# Altium PCB BMS-v1.1.PcbDoc (part 2 of 2)
Units mil, origin at the board's own origin, x right, y up, seen from the top; angles counter-clockwise.
Board outline 1574.8 x 1574.8 mil, 2 copper layers (Top Layer, Bottom Layer), stack 34 mil thick; 76 components, 45 nets, 204 pads, 110 vias.
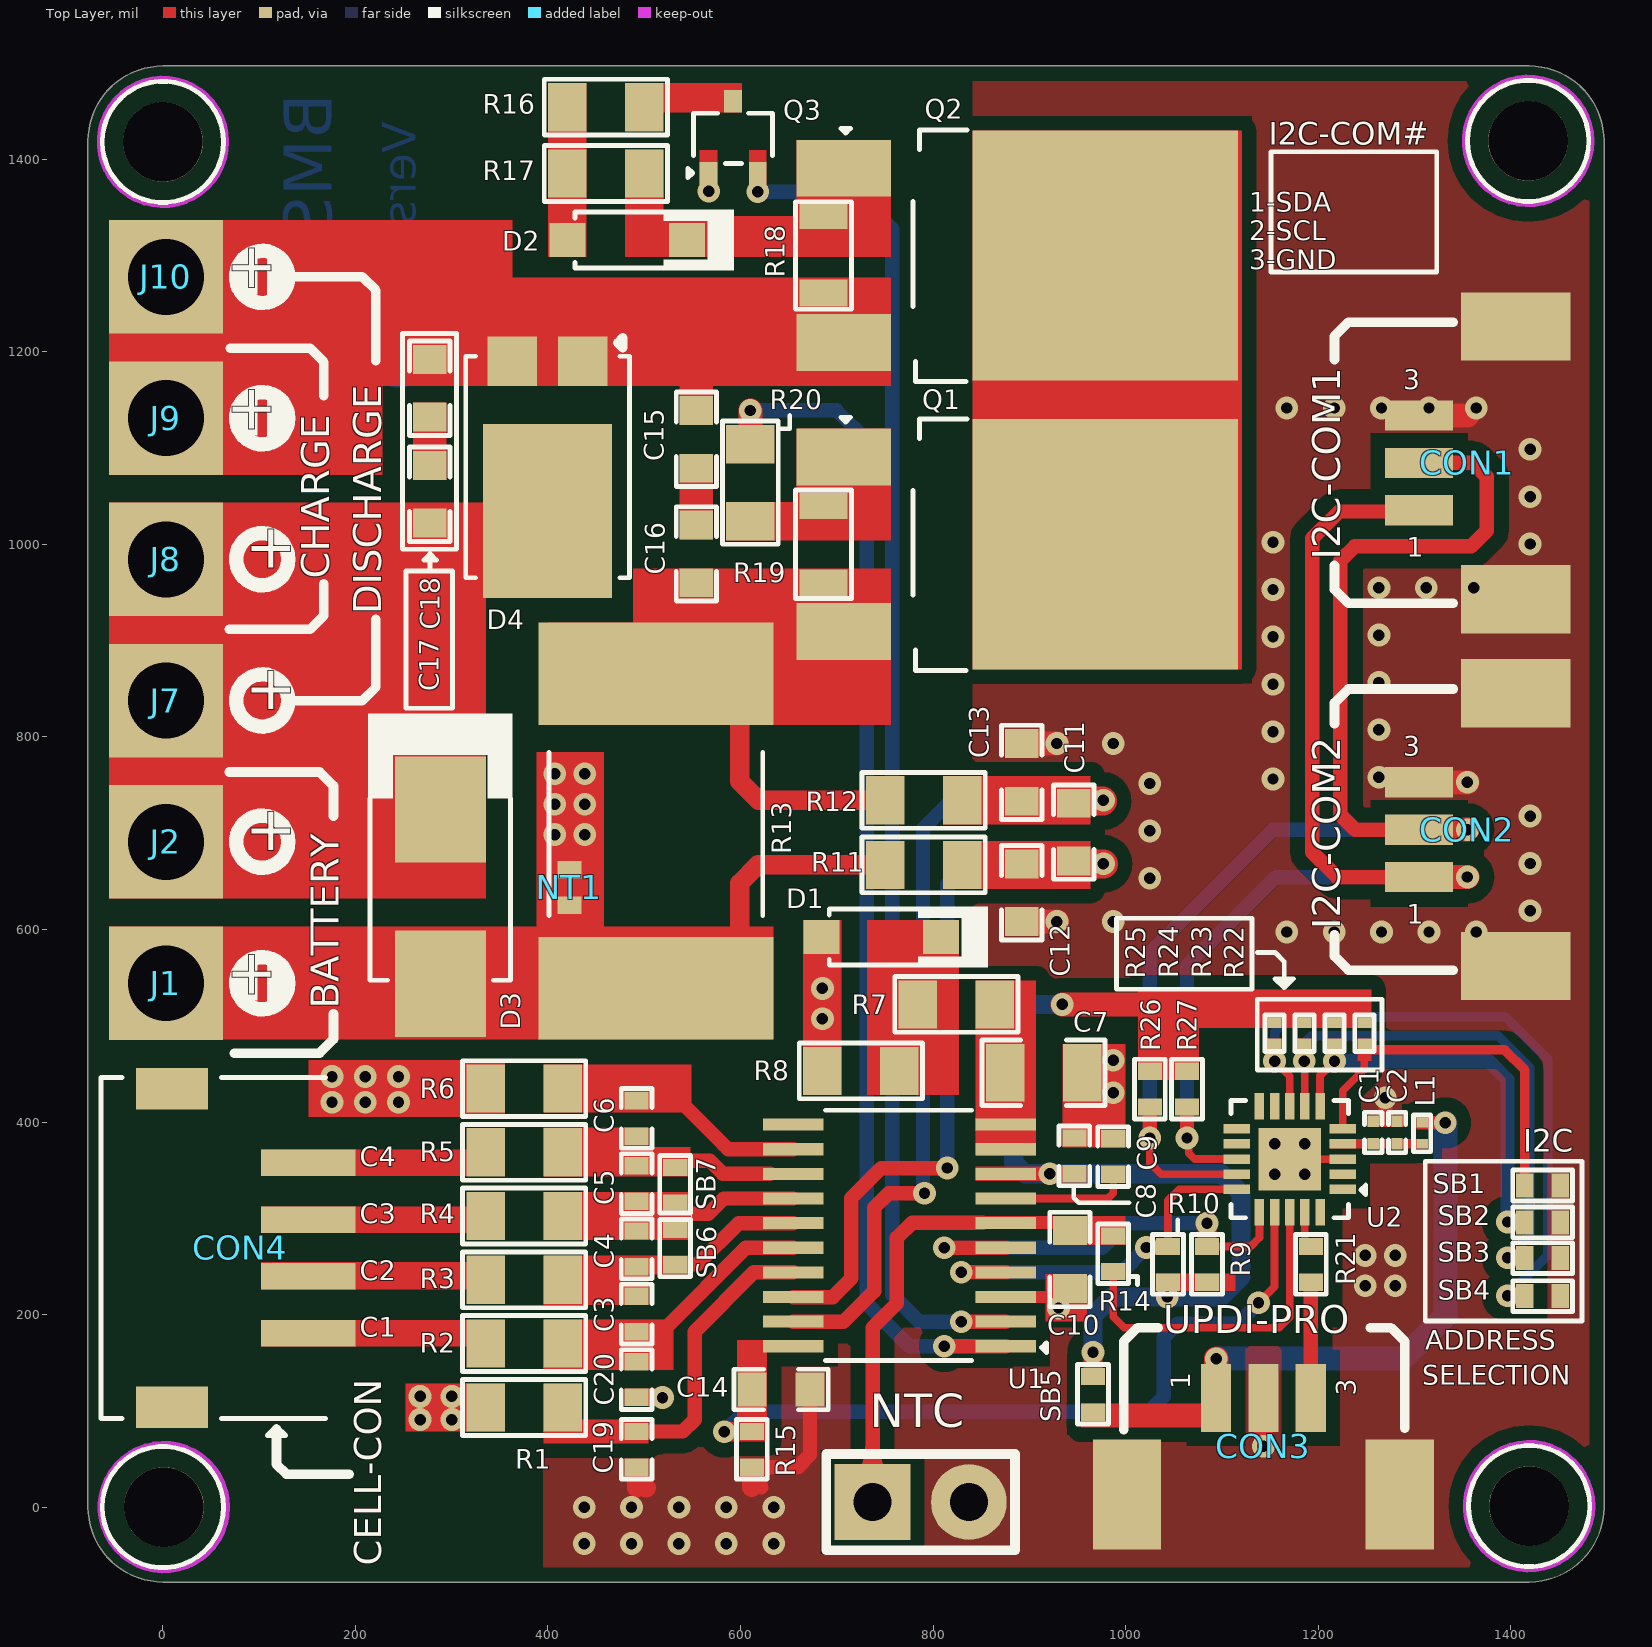
[diagram p0: Top Layer view]

## Via types
v1: diameter 23.62, hole 11.81, Top Layer to Bottom Layer, tented both sides, 110 vias

## Nets (pads, with @x,y where several pads share a name; then routed paths per layer and width w, separated by ;. In a path a pad name is that pad's centre, name@x,y a point inside that pad or via, vN(x,y) a via of type N, cw(c..) or ccw(c..) an arc to the next point about the centre after c; other vN are vias at no path point) (continued)
GND: (continued)
  other v1: 437.63,-37.89 486.84,-37.89 536.05,-37.89 585.26,-37.89 634.48,-37.89 437.63,-0.12 486.84,-0.12 536.05,-0.12 585.26,-0.12 634.48,-0.12 518.99,113.79 930.37,206.83 1248.95,229.91 1280.2,229.91 1248.95,261.49 1280.2,261.49 1154.79,345.7 1186.03,345.7 1154.79,377.28 1186.03,377.28 1269.85,425.13 987.2,430.43 987.2,464.27 1167.5,597.39 1216.72,597.39 1265.93,597.39 1315.14,597.39 1364.36,597.39 987.2,608.2 1420.2,619.41 1025.2,653.2 1420.2,668.62 407.08,698.57 438.33,698.57 1025.2,702.41 1420.2,717.84 407.08,730.15 438.33,730.15 1025.2,751.62 1153.11,756.34 1263.2,758.2 407.08,761.73 438.33,761.73 987.2,793.2 1153.11,805.55 1263.2,807.41 1153.11,854.77 1263.2,856.62 1153.11,903.98 1263.2,905.84 1153.11,953.19 1263.2,955.05 1312.41,955.05 1361.62,955.05 1420.2,1000.41 1153.11,1002.4 1420.2,1049.62 1420.2,1098.84 1167.5,1141.78 1216.72,1141.78 1265.93,1141.78 1315.14,1141.78 1364.36,1141.78 566.96,1366.9
NetC1_1: C1.1 C2.1 L1.2 U2.4
NetC15_2: C15.2 C16.1
NetC17_1: C17.1 C18.2
NetD1_2: D1.2 R7.1 R8.2
NetD2_1: D2.1 R16.1 R17.2
NetD2_2: D2.2 Q2.1 R17.1 R18.2
NetQ1_1: Q1.1 R19.2 R20.2
NetQ1_2: Q1.2 Q2.2
NetQ3_3: Q3.3 R16.2
NetR21_1: R21.1 U2.19 | length 38.3
  Top Layer w8: U2.19 1186.28,276.82 R21.1
PACK_N: C15.1 C18.1 D4.1 D4.2 J9.1 J10.1 Q2.3 R18.1
SCL: R9.1 U1.5 U2.16 | length 450.8
  Top Layer w8: R9.1 1129.87,270.69 1139.04,279.86 U2.16
  Top Layer w15: v1(811.78,269.4) U1.5
  Top Layer w20: R9.1@1084.64,276.01 v1(1084.64,294.99)
  Bottom Layer w15: v1(811.78,269.4) 975.8,269.4 1001.39,294.99 v1(1084.64,294.99)
SDA: R10.1 U1.4 U2.15 | length 397.4
  Top Layer w8: R10.1@1044.13,269.32 1044.13,318.54 1055.63,330.03 U2.15
  Top Layer w15: v1(829.3,244.09) 829.44,243.95 875.29,243.95 U1.4
  Top Layer w16: v1(1021.46,269.68) 1021.96,270.19 1043.63,270.19 R10.1
  Bottom Layer w15: v1(829.3,244.09) 995.87,244.09 v1(1021.46,269.68)
SRN: C11.1 C13.1 R12.2 U1.19 | length 854.6
  Top Layer w8: C11.1 C11.1@948.2,733.2
  Top Layer w15: U1.19 706.96,192.63 738.73,224.4 738.73,310.81 754.06,326.15 v1(791.2,326.15)
  Top Layer w20: C11.1@948.2,733.2 950.21,731.2 C11.1@952.52,733.51 ; v1@976.3,733.51 v1(977,734.2)
  Top Layer w30: C11.1@952.52,733.51 v1@976.3,733.51
  Bottom Layer w15: v1(791.2,326.15) 789.59,327.76 789.59,704.57 819.22,734.2 v1(977,734.2)
SRP: C11.2 C12.1 R11.2 U1.18 | length 762
  Top Layer w8: C11.2 C11.2@949.2,668.2
  Top Layer w15: U1.18 695.91,218.22 715.2,237.51 715.2,321.04 746.35,352.19 v1(814.9,352.19)
  Top Layer w30: C11.2@949.2,668.2 v1(977,668.2)
  Bottom Layer w15: v1(814.9,352.19) 814.9,646.9 836.2,668.2 v1(977,668.2)
TS1: C10.2 NTC.1 R14.1 U1.6 | length 390.4
  Top Layer w15: NTC.1@737.2,-4.8 737.2,186.38 762.51,211.69 762.51,279.64 778.31,295.45 U1.6@851.44,295.45
UPDI: CON3.3 R21.2 | length 120.3
  Top Layer w15: CON3.3 R21.2
VC0: C19.2 R1.2 U1.17 | length 284.8
  Top Layer w15: C19.2 539.99,78.56 552.33,90.91 552.33,182.33 613.81,243.81 U1.17
VC1: C3.1 C20.2 R2.2 U1.16 | length 224.4
  Top Layer w15: 469.2,186.08 C3.1@492.18,186.08 ; C3.1 C3.1@495.24,182 ; C3.1@492.18,183.5 503.38,183.5 505.96,186.08 522.27,186.08 605.59,269.4 U1.16
VC2: C3.2 C4.1 R3.2 SB6.1 U1.15 | length 169.6
  Top Layer w15: 477.18,249.79 478.68,248.29 ; 504.81,251.49 507.11,253.78 SB6.1@530.2,253.78 ; SB6.1 SB6.1@533.11,252.61 ; SB6.1@533.11,251.61 533.54,252.04 555.18,252.04 598.14,294.99 U1.15
VC3: C4.2 C5.1 R4.2 SB6.2 SB7.1 U1.14 | length 190.8
  Top Layer w15: 471.7,302.35 474.09,304.74 566.7,304.74 582.55,320.58 U1.14
VC4: C5.2 C6.1 R5.2 SB7.2 U1.13 | length 99.4
  Top Layer w15: SB7.2@530.2,352.7 SB7.2@533.7,352.7 ; SB7.2@540.62,359.62 568.26,359.62 581.77,346.11 U1.13@630.97,346.11
VC5: C6.2 R6.2 U1.12 | length 260.7
  Top Layer w15: 477.19,422.27 482.28,417.19 C6.2@492.19,417.19 ; 491.39,434.69 507.43,418.64 ; C6.2@492.19,420.77 C6.2@502.39,420.77 ; 504.69,431.27 527.72,431.27 541.8,417.19 ; 505.98,417.19 541.8,417.19 ; U1.12 587.22,371.77 582.83,376.16 541.8,417.19
VDD: CON3.1 L1.1 SB5.2 | length 498.4
  Top Layer w8: CON3.1@1093.7,113.68 CON3.1
  Top Layer w25: CON3.1@1093.7,113.68 1094.2,114.18 v1(1094.2,154.2)
  Bottom Layer w25: v1(1094.2,154.2) 1288.2,154.2 1332.2,198.2 v1(1332.2,399.2)
pads on no net: CON4.MP1 CON4.MP2 U1.11 U2.1 U2.2 U2.9 U2.10 U2.11 U2.12 U2.20

## Polygon pours and split planes (outlines as drawn)
GND on Bottom Layer "GND_L02_P002" (solid, remove dead copper, pour order 2): 304.2,1497 1419.2,1497 cw(c1419.2,1419.2) 1497,1419.2 1497,0 cw(c1419.2,0) 1419.2,-77.8 0,-77.8 cw(c0,0) -77.8,0 -77.8,371.56 304.2,371.56
BATT_N on Bottom Layer "BATT_N_L02_P000" (solid, pour order 0): -55.86,603.33 62.25,603.33 62.25,485.22 62.2,485.17 62.2,182.2 111.98,132.41 332.23,132.41 332.23,50.1 332.2,50.07 332.2,-52.8 26.24,-52.8 -55.86,29.29
BATT_P on Bottom Layer "BATT_P_L02_P001" (solid, pour order 1): -55.86,1043.52 264.17,1043.52 288.2,1019.49 288.2,602.21 315.92,574.48 696.33,574.48 707.86,562.96 707.86,393.86 696.2,382.2 135.2,382.2 110.46,406.94 110.46,612.94 91.44,631.95 -55.86,631.95
PACK_N on Top Solder "NONET_L-01_P-001" (solid): 477.58,1175.77 477.58,1203.52 321.2,1203.52 321.2,1175.77 244.2,1175.77 244.2,1325.31 346.74,1325.31 346.74,1261.2 645.2,1261.2 645.2,1175.77
GND on Top Layer "GND_L01_P006" (solid, remove dead copper, pour order 6): 1497,-77.8 395.25,-77.8 395.25,186.4 1225.65,186.4 1225.65,462 1224.32,463.34 838.48,463.34 841.13,854.98 841.13,1481.2 1497,1481.2

## Keep-outs
Keep-Out Layer:
  circle w5: c1,0 r66.34
  circle w5: c1419.2,1 r66.34
  circle w5: c1418.2,1419.2 r66.34
  circle w5: c0,1418.2 r66.34

## Other copper
Top Layer:
  rectangle net PACK_N: -55.86,1072.14 228.2,1186.2
  rectangle net PACK_N: -55.86,1244.2 362.97,1336.98
  rectangle net NetQ1_2: 841.23,870.28 1120.82,1430.12
  rectangle net GND: 1251.41,395.1 1289.34,406.91
  region net GND: 1277.05,425.13 1262.67,425.13 1262.67,395.06 1277.05,395.06
  rectangle net BATT_N: 388.14,591.96 458.14,634.2
  rectangle net BATT_N: 252.05,78.41 355.25,128.41
  rectangle net 3V3: 1031.2,218.22 1055.04,242.69
  rectangle net 3V3: 1012.7,443.7 1076.3,537.94
  rectangle net GND: 479.7,105.01 518.99,123.01
  rectangle net 3V3: 1051.3,497.7 1255.32,537.94
  rectangle net GND: 388.14,653.2 458.14,784.2
  rectangle net GND: 1191.21,357.67 1239.43,365.13
  rectangle net GND: 916.8,192.63 959.7,242.2
  rectangle net GND: 934.36,373.7 999.7,481.13
  rectangle net CHG: 608.63,1373.65 627.14,1409.56
  rectangle net GND: 557.45,1373.65 575.96,1409.56
  rectangle net 3V3: 1048.63,224.69 1114.14,242.69
  rectangle net BATT_N: -55.86,485.66 634.25,603.33
  rectangle net BATT_N: 332.23,78.41 355.25,128.41
  rectangle net #BATT_P: 843.94,365.47 906.93,403.66
  rectangle net #BATT_P: 843.94,391.06 906.93,547.2
  rectangle net BATT_P: 249.2,944.14 466.51,1043.52
  rectangle net NetQ1_1: 585.2,1004.2 756.58,1044.2
  rectangle net VC4: 461.43,343.56 548.2,373.93
  rectangle net VC2: 461.43,241.7 548.2,261.28
  rectangle net VC3: 395.19,277.35 548.2,327.35
  rectangle net ALERT: 596.52,67.9 627.55,173.34
  rectangle net VC1: 395.19,142.21 530.62,194.93
  rectangle net VC2: 395.22,210 504.68,261.14
  rectangle net VC4: 395.19,343.56 504.69,394.27
  rectangle net VC0: 395.25,65.91 435.25,128.41
  rectangle net VC0: 395.25,65.91 504.7,90.91
  rectangle net VC5: 395.19,409.69 549.23,459.69
  rectangle net BATT_P: 151.06,405.2 355.19,464.2
  rectangle net NetQ3_3: 480.2,1448.45 601.55,1479.2
  rectangle net NetD1_2: 731.2,574.48 826.91,609.91
  rectangle net NetD1_2: 731.2,428.13 826.91,609.91
  rectangle net BATT_P: 664.99,428.13 704.99,609.91
  rectangle net NetC17_1: 259.7,1067.2 294.7,1147.2
  rectangle net SRP: 810.23,642.2 963.7,692.2
  rectangle net SRN: 810.22,709.2 963.7,759.2
  rectangle net #DSG: 488.2,812.43 756.58,975.2
  rectangle net #DSG: 400.15,812.43 756.58,918.73
  rectangle net BATT_P: -55.86,631.95 335.44,1043.52
  rectangle net NetQ1_1: 658.16,1026.42 756.58,1120.28
  rectangle net PACK_N: 536.7,1124.2 571.7,1190.2
  rectangle net NetC15_2: 536.7,1005.2 571.7,1094.2
  rectangle net NetD2_2: 480.19,1298.48 756.58,1341.2
  rectangle net NetD2_2: 480.19,1298.48 520.19,1410.39
  rectangle net NetD2_1: 400.2,1298.48 440.19,1479.2
  rectangle net NetD2_2: 658.16,1327.42 756.58,1420.28
  rectangle net BATT_P: -55.86,631.95 62.25,1043.52
  rectangle net PACK_N: -55.86,1072.14 62.25,1336.98
  rectangle net PACK_N: -55.86,1164.61 756.58,1277.2
  region net VDD: 1332.2,392 1332.2,406.38 1302.13,406.38 1302.13,392
  rectangle net NetC1_1: 1211.87,372.36 1313.94,382.2
  rectangle net VDD: 953.7,82.7 1109.73,107.7
  rectangle net NetC1_1: 1211.87,372.36 1239.43,382.2
  rectangle net ADD1: 1240.75,463.34 1255.32,486.68
  rectangle net ADD2: 1209.75,463.34 1224.32,486.68
  rectangle net ADD3: 1178.75,463.34 1193.32,486.68
  rectangle net ADD4: 1147.58,463.34 1162.15,486.68
  rectangle net TS1: 924.7,272.2 999.7,302.2
  rectangle net TS1: 843.94,288.69 999.7,302.2
  rectangle net GND: 843.94,211.92 959.7,224.52
  rectangle net 3V3: 843.94,338.88 921.35,353.88
  rectangle net 3V3: 921.35,337.37 959.36,355.37
  rectangle net C1: 101.85,166.84 335.91,194.4
  rectangle net C3: 101.85,284.95 344.2,312.51
  rectangle net C2: 101.85,225.89 355.22,254.7
  rectangle net C4: 101.85,344 335.19,371.56
Bottom Layer:
  text "BMS" at 175.41,1468.09 h50 r90
  text "Version_1.0" at 274.2,1439.2 h60 r90
  text "(3S-1P)" at 173.2,1315.31 h40 r90

## Silkscreen, mask and mechanical layers (free items; w line width, h text height)
Top Overlay:
  circle w5: c0,0 r62.99
  circle w5: c1418.2,1419.2 r62.99
  circle w5: c0,1418.2 r62.99
  circle w5: c1419.2,1 r62.99
  circle w15: c103.2,1277.85 r27.1
  circle w15: c103.2,1131.12 r27.1
  circle w15: c103.2,984.65 r27.1
  circle w15: c103.2,837.92 r27.1
  circle w15: c103.2,544.2 r27.1
  circle w15: c103.2,691.19 r27.1
  region: 98.3,1259.85 98.3,1297.22 82.7,1297.22 82.7,1259.85
  region: 127.8,1258.56 127.8,1297.43 108.03,1297.43 108.03,1258.56
  region: 98.3,1113.12 98.3,1150.48 82.7,1150.48 82.7,1113.12
  region: 127.8,1111.83 127.8,1150.7 108.03,1150.7 108.03,1111.83
  region: 127.8,524.91 127.8,563.77 108.03,563.77 108.03,524.91
  region: 98.3,526.2 98.3,563.56 82.7,563.56 82.7,526.2
  lines w5: 114.46,75.76 119.86,81.16 120.19,81.16 ; 117.88,83.87 117.8,83.87 108.35,74.41 117.8,74.41 ; 117.95,83.87 127.41,74.41 117.95,74.41 ; 122.68,79.14 117.95,74.41 ; 277.52,972.4 277.52,988.48 ; 639.23,1120.2 651.09,1120.2 651.09,1133.8 ; 946.2,332.87 946.2,321.53 951.53,316.2 1003.43,316.2 ; 1003.2,239.44 1012.53,239.44 1012.53,231.2 ; 1054.04,283.73 1054.27,283.73 1054.27,298.5 ; 1136.84,576.25 1155.26,576.25 1164.79,566.72 1164.79,539.43 1164.86,539.43 1174.32,548.88 1164.87,548.88 ; 1159.99,544.15 1164.71,548.88 1164.87,548.88 ; 1164.71,548.88 1155.26,548.88 1164.71,539.43 ; 1169.59,544.15 1164.87,548.88 1164.87,548.88 ; 117.8,74.41 117.95,74.41 ; 117.8,74.41 117.8,74.42 ; 249,995 305,995 305,1219 249,1219 249,995 ; 252.38,829.74 300.83,829.74 300.83,972.4 252.38,972.4 252.38,829.74 ; 270.89,983.73 284.16,983.73 277.52,990.48 270.89,983.73 ; 990.49,537.94 1131.41,537.94 1131.41,611.62 990.49,611.62 990.49,537.94 ; 1136.84,454.2 1266.32,454.2 1266.32,527.52 1136.84,527.52 1136.84,454.2 ; 1151.18,1282.89 1323.32,1282.89 1323.32,1407.85 1151.18,1407.85 1151.18,1282.89 ; 1311.27,193.2 1474.2,193.2 1474.2,359.33 1311.27,359.33 1311.27,193.2
  lines w10: 68.78,763.64 162.79,763.64 177.2,749.23 177.2,717.89 ; 68.78,911.84 152.79,911.84 167.2,926.25 167.2,958.9 ; 70.03,1203.83 152.79,1203.83 167.2,1189.42 167.2,1154.48 ; 74.2,471.65 162.79,471.65 177.2,486.05 177.2,512.47 ; 117.95,80.68 117.95,44.44 128.2,34.2 193.44,34.2 ; 135.3,837.74 207.26,837.74 221.2,851.67 221.2,922.08 ; 135.3,1278.04 207.26,1278.04 221.2,1264.1 221.2,1190.89 ; 998.09,80.4 998.09,171.99 1012.5,186.4 1034.04,186.4 ; 1217.1,594.7 1217.1,572.26 1231.51,557.85 1340.34,557.85 ; 1217.1,813.88 1217.1,835.43 1231.51,849.84 1340.34,849.84 ; 1217.1,978.15 1217.1,953.26 1231.51,938.85 1340.34,938.85 ; 1217.1,1192.06 1217.1,1216.43 1231.51,1230.84 1340.34,1230.84 ; 1254.31,186.4 1275.67,186.4 1290.08,171.99 1290.08,81.79
  text "I2C-COM#" at 1148.91,1407.34 h40
  text "1-SDA / 2-SCL / 3-GND" at 1128.56,1285.81 h20
  text "+" at 127.8,1260.24 h80 r90
  text "3" at 1288.69,1161.46 h20
  text "+" at 127.8,1113.51 h80 r90
  text "1" at 1292.2,987.2 h20
  text "I2C-COM1" at 1232.65,983.99 h50 r90
  text "CHARGE" at 182.74,964.18 h50 r90
  text "+" at 85.59,960.05 h80
  text "DISCHARGE" at 236.74,927.47 h50 r90
  text "+" at 85.59,813.32 h80
  text "3" at 1288.69,780.46 h20
  text "+" at 85.59,666.59 h80
  text "1" at 1292.2,606.2 h20
  text "I2C-COM2" at 1232.65,600.01 h50 r90
  text "+" at 127.8,526.59 h80 r90
  text "BATTERY" at 192.74,517.73 h50 r90
  text "I2C" at 1412.93,361.34 h40
  text "C4" at 204.47,347.21 h35
  text "C3" at 204.47,288.15 h35
  text "C2" at 204.47,229.1 h35
  text "UPDI-PRO" at 1039.35,170.85 h50
  text "C1" at 204.47,170.04 h35
  text "ADDRESS" at 1311.53,156.86 h35
  text "SELECTION" at 1307.94,127.1 h20
  text "1" at 1067,122.43 h20 r90
  text "3" at 1239.24,115.82 h20 r90
  text "CELL-CON" at 236.14,-60.98 h48 r90
Bottom Overlay:
  circle w5: c635.73,157.87 r10.34
  circle w5: c547.5,306.74 r10.34
  lines w5: 100.32,214.18 686.26,214.18 ; 100.32,288.52 688,288.08 ; 102.24,176.41 686.69,176.41 ; 102.24,251.4 687.56,251.4 ; 102.24,325.74 688,325.74 ; 242.32,371.88 242.32,139.81 100.32,139.81 100.32,371.88 688,371.88 688,139.81 243.32,139.81 ; 385.32,139.81 385.32,370.94 ; 527.37,139.81 527.37,370.94 ; 629.36,153.46 641.18,153.46 ; 631.2,150.36 640.46,150.36 ; 630.46,162.79 642.28,162.79 639.71,165.36 630.46,165.36 630.46,162.79
  text "CELL-CON" at 491.8,383.33 h50
  text "5 CELLs" at 230.61,337.98 h35
  text "4 CELLs" at 374.21,337.66 h35
  text "3 CELLs" at 515.73,337.66 h35
  text "CELL IN" at 678.7,332.31 h35
  text "+" at 555.24,296.22 h35
  text "&" at 621.98,285.88 h20
  text "5" at 152.98,285.52 h20
  text "CELL" at 237.97,285.52 h20
  text "4" at 290.98,285.52 h20
  text "CELL" at 375.97,285.52 h20
  text "3" at 429.04,285.52 h20
  text "CELL" at 514.03,285.52 h20
  text "B" at 591.81,285.02 h20
  text "C4" at 677.98,285.39 h20
  text "&" at 621.98,249.01 h20
  text "4" at 152.98,248.65 h20
  text "CELL" at 237.97,248.65 h20
  text "SB7" at 353.78,248.65 h20
  text "SB7" at 491.83,248.65 h20
  text "C4" at 589.81,248.15 h20
  text "C3" at 677.98,248.51 h20
  text "3" at 152.98,211.77 h20
  text "CELL" at 237.97,211.77 h20
  text "3" at 290.98,212.47 h20
  text "CELL" at 375.97,211.77 h20
  text "SB6" at 491.83,211.77 h20
  text "&" at 621.98,212.13 h20
  text "C3" at 589.81,211.27 h20
  text "C2" at 677.98,211.63 h20
  text "2" at 152.98,173.9 h20
  text "CELL" at 237.97,173.9 h20
  text "2" at 290.98,174.59 h20
  text "CELL" at 375.97,173.9 h20
  text "2" at 429.04,174.59 h20
  text "CELL" at 514.03,173.9 h20
  text "&" at 621.98,174.26 h20
  text "C1" at 674.98,173.76 h20
  text "C2" at 589.81,173.4 h20
  text "+" at 643.48,147.35 h35
  text "1" at 152.23,137.02 h20
  text "CELL" at 237.22,137.02 h20
  text "1" at 290.23,137.02 h20
  text "CELL" at 375.22,137.02 h20
  text "1" at 428.29,137.02 h20
  text "CELL" at 513.28,137.02 h20
  text "&" at 621.98,137.38 h20
  text "B" at 679.98,136.88 h20
  text "C1" at 586.81,136.52 h20
Dimensions:
  drawing of 191 lines, arcs and shapes, not listed
  text "Layer" at 1927.09,2169 h60
  text "Name" at 2337,2169 h60
  text "Material" at 3266.74,2169 h60
  text "Thickness" at 4126.51,2169 h60
  text "Constant" at 4776.35,2169 h60
  text "Board Layer Stack" at 5346.21,2169 h60
  text "Top Overlay" at 2337,2049 h60
  text "Top Solder" at 2337,1929 h60
  text "Solder Resist" at 3266.74,1929 h60
  text "0.076mm" at 4126.51,1929 h60
  text "3.5" at 4776.35,1929 h60
  text "1" at 1927.09,1809 h60
  text "Top Layer" at 2337,1809 h60
  text "0.229mm" at 4126.51,1809 h60
  text "Dielectric 1" at 2337,1689 h60
  text "FR-4" at 3266.74,1689 h60
  text "0.406mm" at 4126.51,1689 h60
  text "4.8" at 4776.35,1689 h60
  text "2" at 1927.09,1569 h60
  text "Bottom Layer" at 2337,1569 h60
  text "0.229mm" at 4126.51,1569 h60
  text "Bottom Solder" at 2337,1449 h60
  text "Solder Resist" at 3266.74,1449 h60
  text "0.076mm" at 4126.51,1449 h60
  text "3.5" at 4776.35,1449 h60
  text "Bottom Overlay" at 2337,1329 h60
  text "Total board thickness:" at 1927.09,1209 h60
  text "1.016mm" at 4126.51,1209 h60
Board Outline:
  lines w5: 1497,0 ccw(c1497,0) 1497,0 ; 1497,0 cw(c1419.2,0) 1419.2,-77.8 0,-77.8 cw(c0,0) -77.8,0 -77.8,1419.2 cw(c0,1419.2) 0,1497 1419.2,1497 cw(c1419.2,1419.2) 1497,1419.2 1497,0
Drill Drawing:
  circle w10: c56.82,2895.03 r33.33
  lines w10: 23.49,2628.37 90.16,2628.37 56.82,2561.7 23.49,2628.37 ; 23.49,2711.7 56.82,2728.37 90.16,2711.7 73.49,2745.03 90.16,2778.37 56.82,2761.7 23.49,2778.37 40.16,2745.03 23.49,2711.7 ; 23.49,3028.37 40.16,3028.37 56.82,3011.7 73.49,3028.37 90.16,3028.37 73.49,3045.03 90.16,3061.7 73.49,3061.7 56.82,3078.37 40.16,3061.7 23.49,3061.7 40.16,3045.03 23.49,3028.37
  lines w15: -36.3,2516.7 7073.77,2516.7 ; -36.3,3116.7 7073.77,3116.7 ; 514.57,2366.7 514.57,3266.7 ; 1104.42,2366.7 1104.42,3266.7 ; 2204.1,2366.7 2204.1,3266.7 ; 2709.97,2366.7 2709.97,3266.7 ; 3443.78,2366.7 3443.78,3266.7 ; 4943.33,2366.7 4943.33,3266.7 ; 5533.17,2366.7 5533.17,3266.7 ; 6278.97,2366.7 6278.97,3266.7 ; -36.3,2366.7 7073.77,2366.7 7073.77,3266.7 -36.3,3266.7 -36.3,2366.7
  text "Symbol" at 53.7,3161.7 h72
  text "Count" at 559.57,3161.7 h72
  text "Hole Size" at 1149.42,3161.7 h72
  text "Plated" at 2249.1,3161.7 h72
  text "Hole Type" at 2754.97,3161.7 h72
  text "Drill Layer Pair" at 3488.78,3161.7 h72
  text "Via/Pad" at 4988.33,3161.7 h72
  text "Pad Shape" at 5578.17,3161.7 h72
  text "Template" at 6323.97,3161.7 h72
  text "110" at 559.57,3011.7 h60
  text "11.81mil (0.300mm)" at 1149.42,3011.7 h60
  text "PTH" at 2249.1,3011.7 h60
  text "Round" at 2754.97,3011.7 h60
  text "Top Layer - Bottom Layer" at 3488.78,3011.7 h60
  text "Via" at 4988.33,3011.7 h60
  text "Rounded" at 5578.17,3011.7 h60
  text "v60h30m0mx0" at 6323.97,3011.7 h60
  text "2" at 559.57,2861.7 h60
  text "39.37mil (1.000mm)" at 1149.42,2861.7 h60
  text "PTH" at 2249.1,2861.7 h60
  text "Round" at 2754.97,2861.7 h60
  text "Top Layer - Bottom Layer" at 3488.78,2861.7 h60
  text "Pad" at 4988.33,2861.7 h60
  text "(Mixed)" at 5578.17,2861.7 h60
  text "(Mixed)" at 6323.97,2861.7 h60
  text "6" at 559.57,2711.7 h60
  text "78.74mil (2.000mm)" at 1149.42,2711.7 h60
  text "PTH" at 2249.1,2711.7 h60
  text "Round" at 2754.97,2711.7 h60
  text "Top Layer - Bottom Layer" at 3488.78,2711.7 h60
  text "Pad" at 4988.33,2711.7 h60
  text "Rectangle" at 5578.17,2711.7 h60
  text "s300h200" at 6323.97,2711.7 h60
  text "4" at 559.57,2561.7 h60
  text "82.68mil (2.100mm)" at 1149.42,2561.7 h60
  text "NPTH" at 2249.1,2561.7 h60
  text "Round" at 2754.97,2561.7 h60
  text "Top Layer - Bottom Layer" at 3488.78,2561.7 h60
  text "Pad" at 4988.33,2561.7 h60
  text "Rounded" at 5578.17,2561.7 h60
  text "c210hn210" at 6323.97,2561.7 h60
  text "122 Total" at 559.57,2411.7 h60

## Dimensions
-77.8,1419.2 to 1497,1419.2 on Dimensions
1419.2,1497 to 1419.2,-77.8 on Dimensions